# Altium PCB Shock_Sensor.PcbDoc (part 1 of 2)
Units mm, origin at the board's own origin, x right, y up, seen from the top; angles counter-clockwise.
Board outline 51.25 x 37.38 mm, 2 copper layers (Top Layer, Bottom Layer), stack 1.448 mm thick; 59 components, 38 nets, 215 pads, 74 vias.
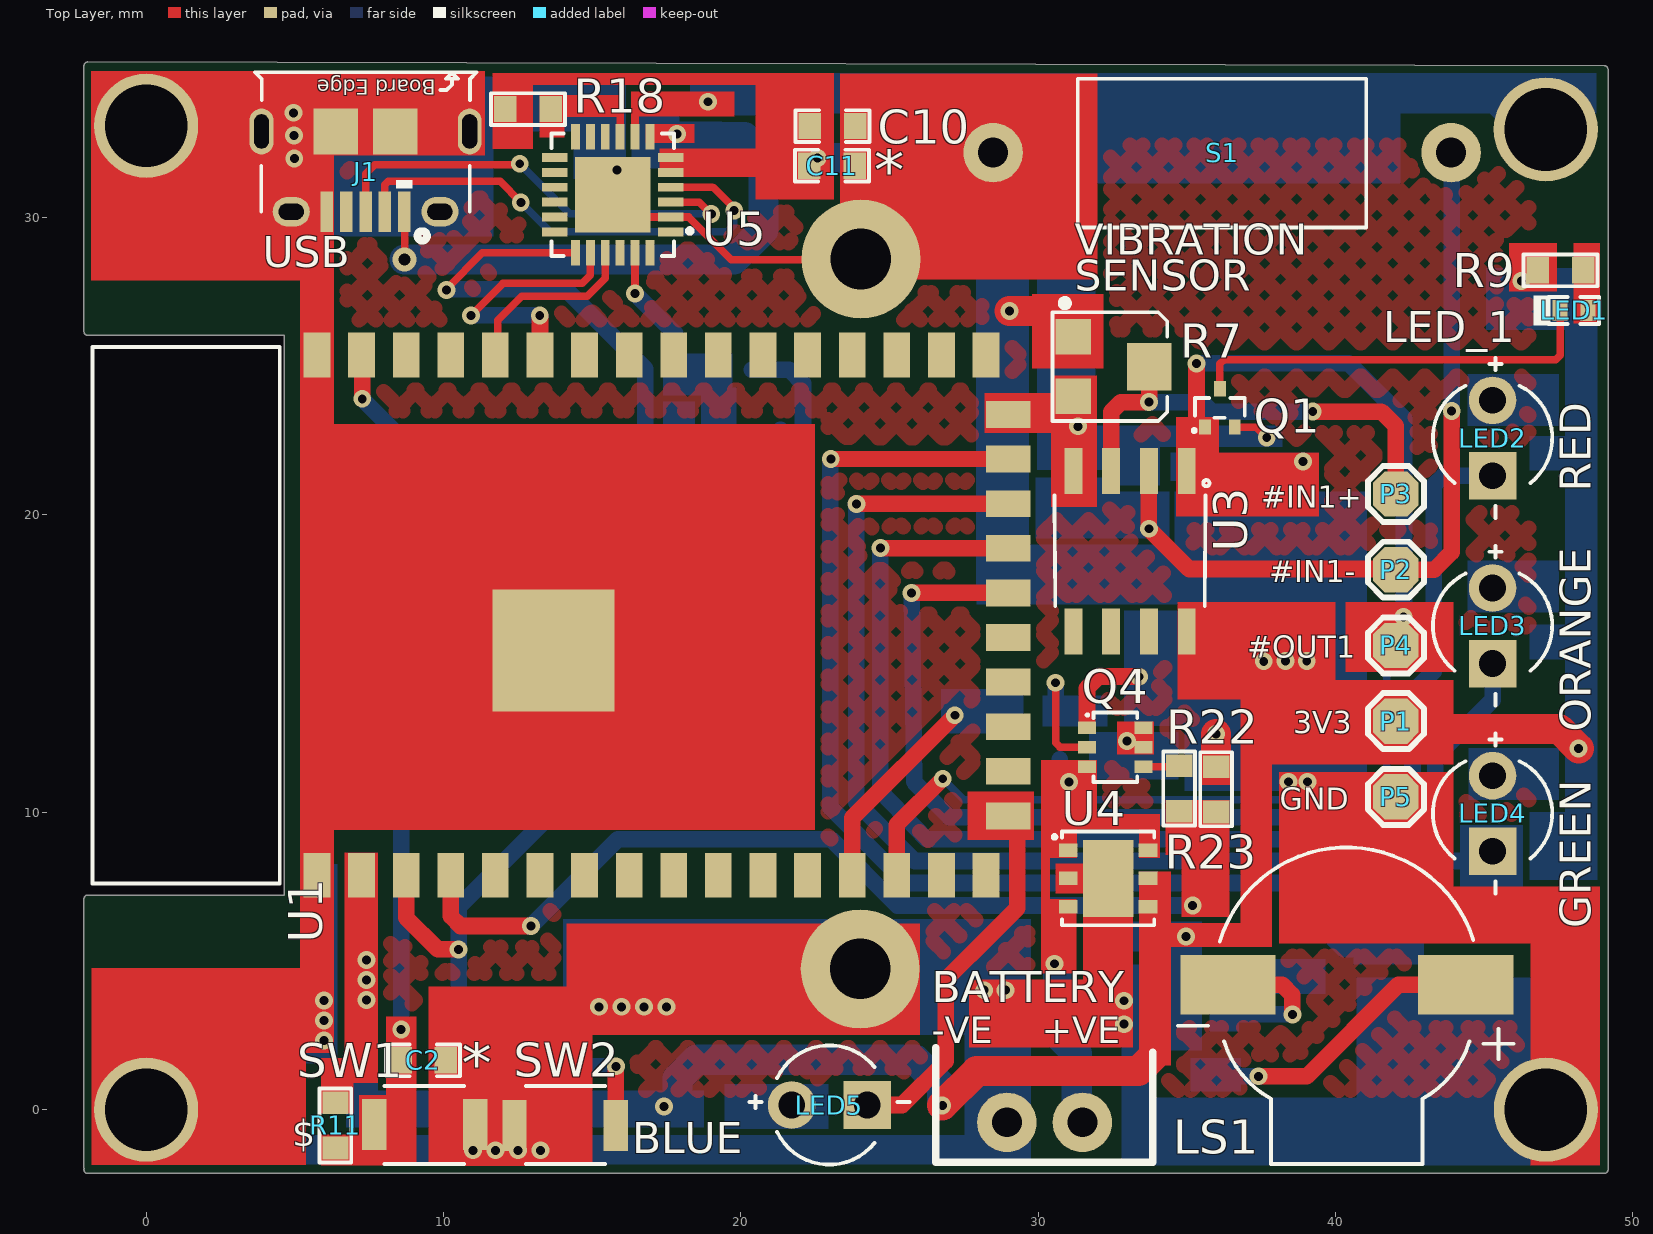
[diagram p0: Top Layer view]
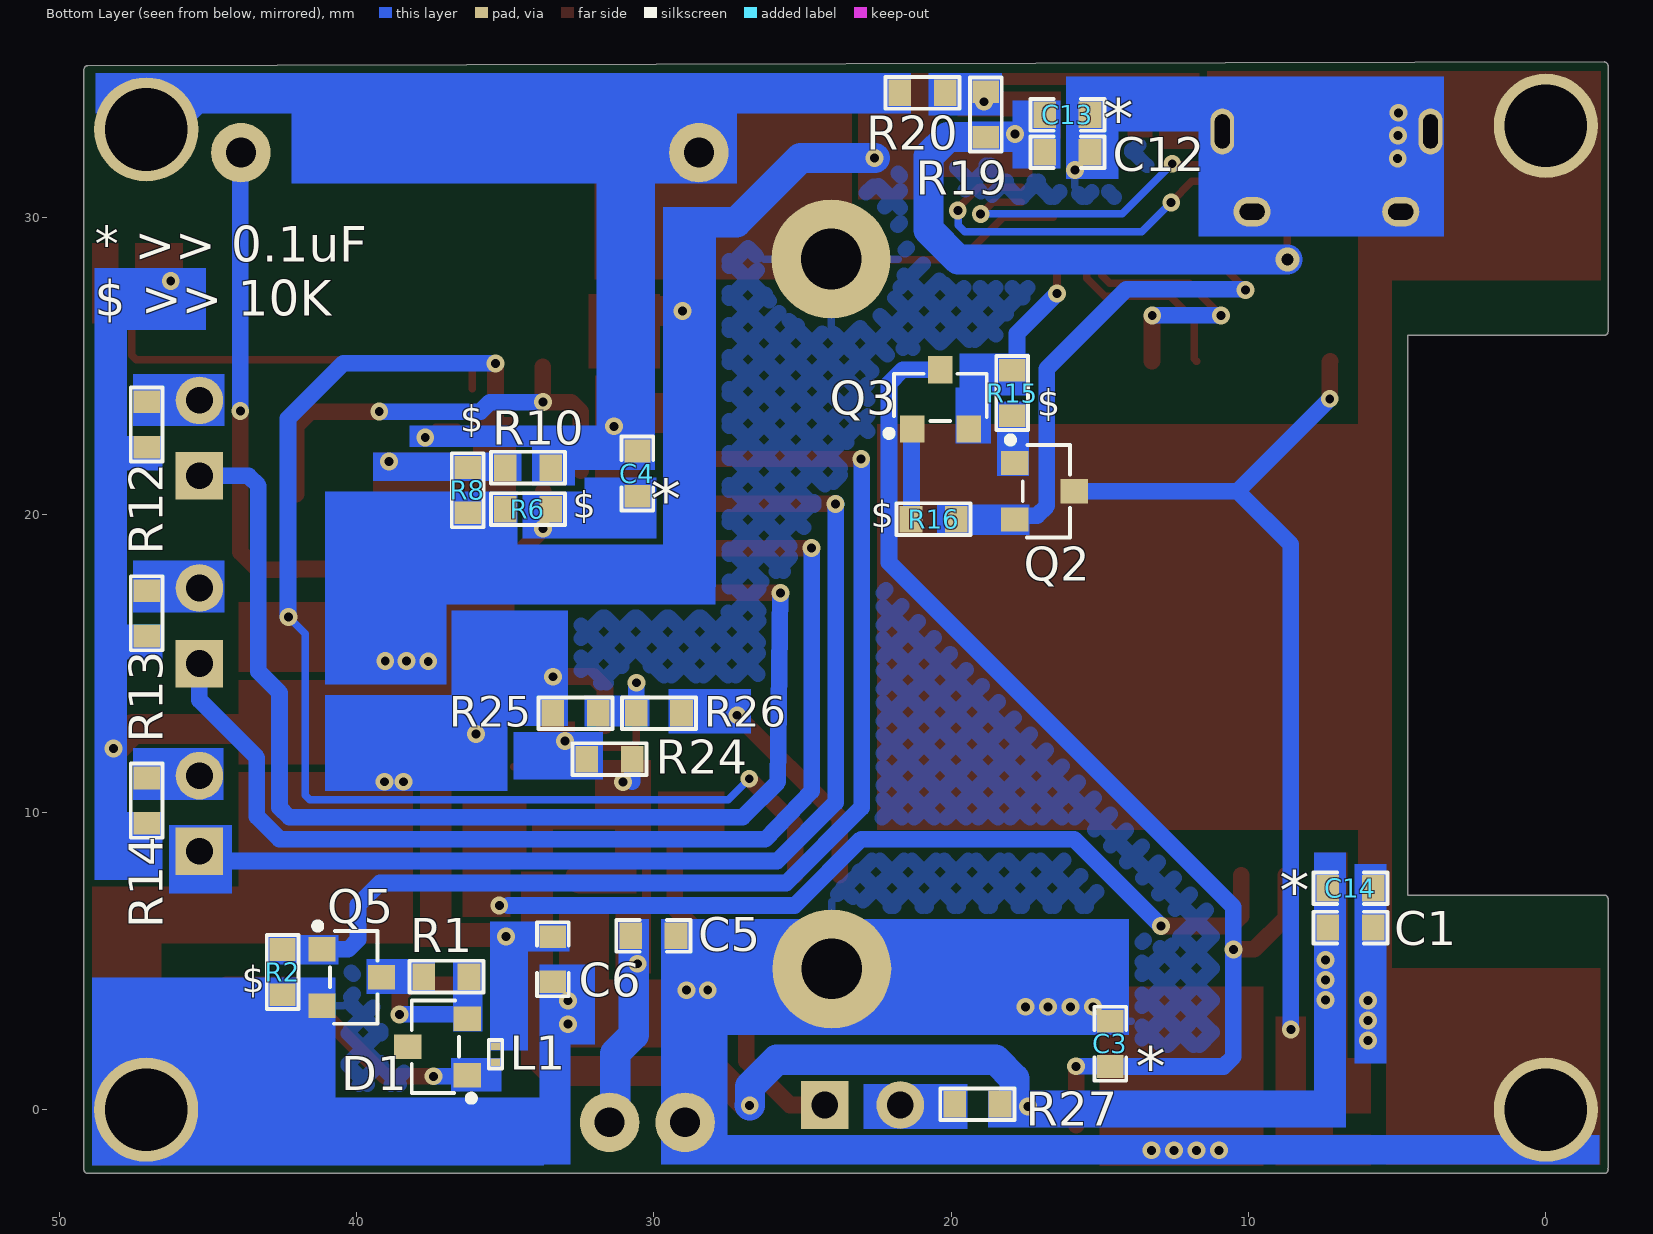
[diagram p1: Bottom Layer view, seen from below]
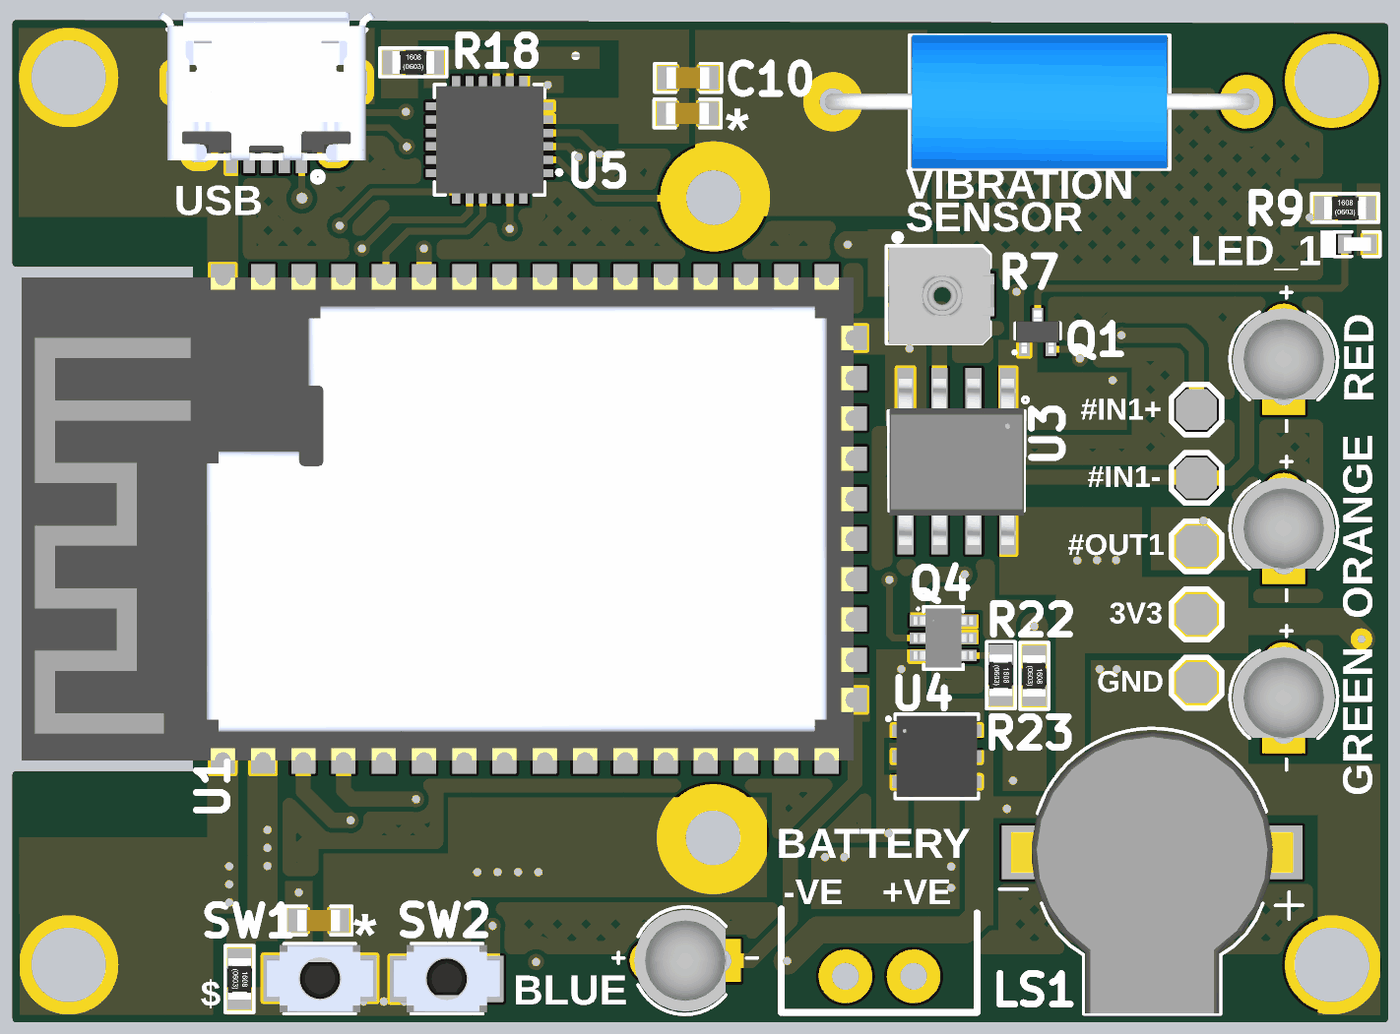
[diagram p2: 3D render of the assembled board from above, using the file's embedded part models]
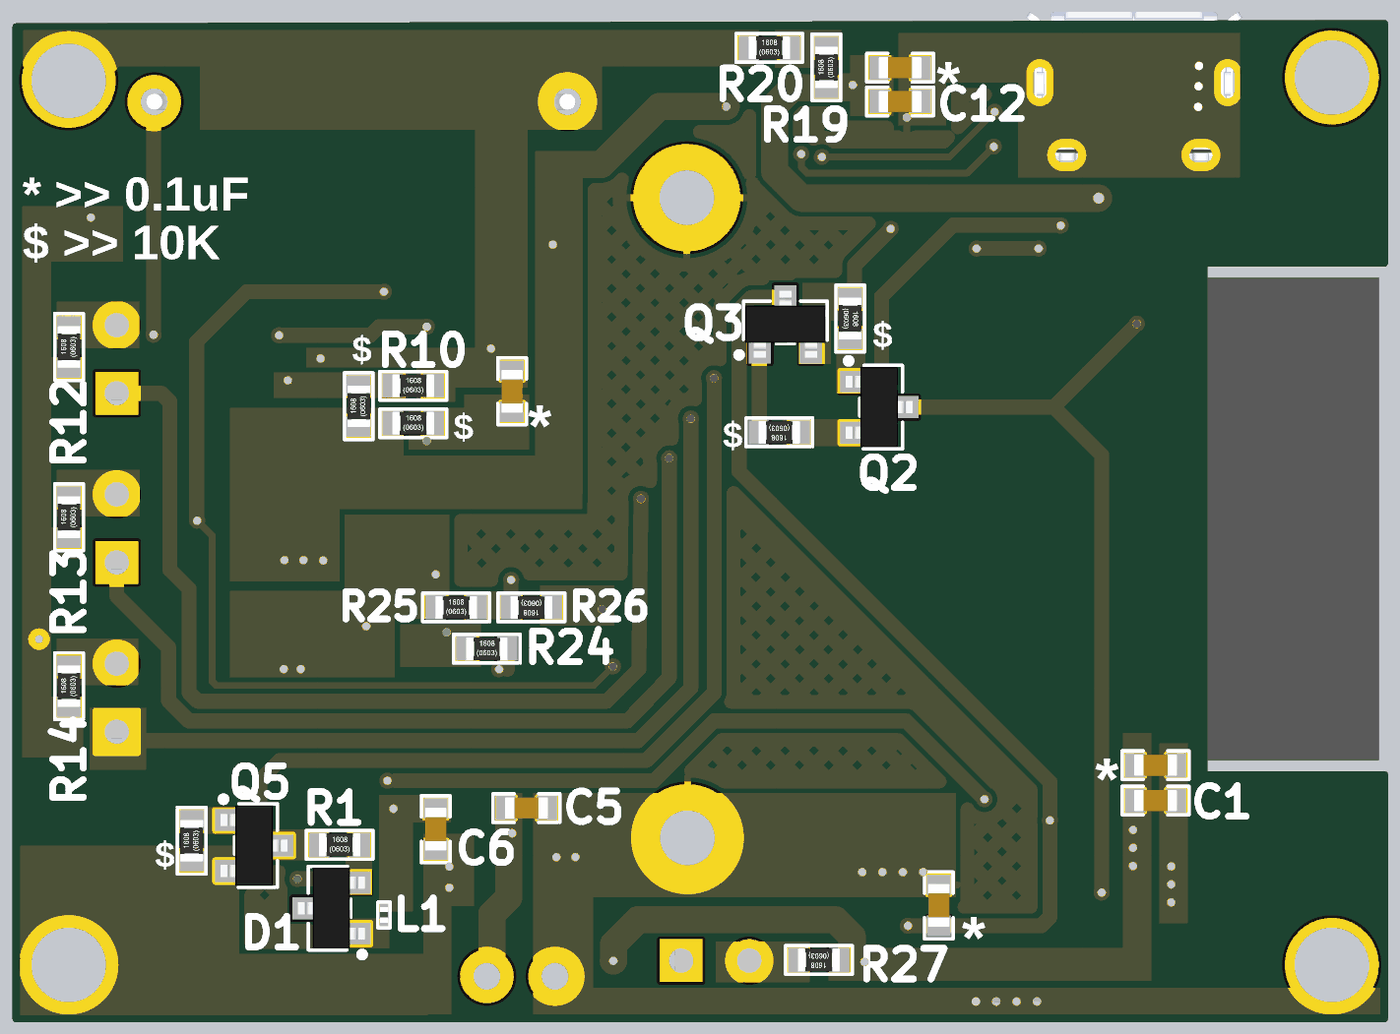
[diagram p3: 3D render of the assembled board from below, using the file's embedded part models]

## Layer stack, top to bottom
Top Solder: solder mask 0.0762, Solder Resist, Dk 3.5
Top Layer: signal copper 0.254
Dielectric 1: dielectric 0.9398, FR-4, Dk 4.8
Bottom Layer: signal copper 0.254
Bottom Solder: solder mask 0.0762, Solder Resist, Dk 3.5

## Board outline
-2.093,-0.148 cw(c-1.966,-0.147) -2.093,-0.147 -2.093,0.564 cw(c-1.966,0.564) -2.093,0.565 -2.093,7.092 cw(c-1.966,7.092) -1.966,7.219 4.638,7.219 4.638,26.04 -1.966,26.04 cw(c-1.966,26.167) -2.093,26.167 -2.093,35.108 cw(c-1.966,35.108) -1.966,35.235 49.034,35.111 cw(c49.034,34.983) 49.161,34.983 49.161,-2.011 cw(c49.034,-2.017) 49.161,-2.017 cw(c49.034,-2.017) 49.034,-2.144 -1.966,-2.144 cw(c-1.966,-2.017) -2.09,-1.989 cw(c-1.966,-1.961)

## Design rules (kind name [scope] priority, off if disabled: settings)
Clearance [All] p1: gap=0.178 ignorepadtopadclearanceinfootprint=FALSE except(0: Arc-Hole Track-Hole SMDPad-Hole THPad-Hole Via-Hole Fill-Hole Poly-Hole Region-Hole Text-Hole; 0.076: Arc-SMDPad Track-SMDPad SMDPad-SMDPad)
HoleSize [All] p1: absolutevalues=TRUE maxlimit=5.08 minlimit=0.025 maxpercent=80.000 minpercent=20.000
HoleToHoleClearance [All] p1: gap=0 allowstackedmicrovias=TRUE
MinimumSolderMaskSliver [All] p1: minsoldermaskwidth=0
PolygonConnect [All] p1: connectstyle=Relief reliefconductorwidth=0.254 reliefentries=4 polygonreliefangle="90 Angle" airgapwidth=0.254
RoutingVias [All] p1: holewidth=0.3 width=0.6 viastyle="Through Hole" minholewidth=0.3 minwidth=0.6 maxholewidth=0.4 maxwidth=0.8
SilkToSilkClearance [All] p1: silktosilkclearance=0
SilkToSolderMaskClearance [IsPad] p1: minsilkscreentomaskgap=0 clearancetoexposedcopper=TRUE
SolderMaskExpansion [All] p1: expansion=0.102 istentingtop=FALSE
Width [All] p1: maxlimit=1.016 minlimit=0.254 preferedwidth=0.559
25 further rules are at their usual default settings.

## Classes and differential pairs
component class U_Sensor_Section: 3 C4 D1 L1 LED1 P1 P2 P3 P4 P5 Q1 Q5 R1 R2 R6 R7 R8 R9 R10 S1 U3
component class U_Power_Section: C5 C6 U4
component class U_Controller_Section: C1 C2 C3 C14 D2 D3 D4 D5 LED2 LED3 LED4 LED5 Q2 Q3 R11 R12 R13 R14 R15 R16 R27 SW1 SW2 U1
component class U_Connector_Section: C10 C11 C12 C13 J1 R18 R19 R20 U5
component class U_ADC_Section: l Q4 R22 R23 R24 R25 R26

## Components (designator, comment, footprint, x,y, rotation, side; value= is the part's Value field where it differs from the comment)
C1 "22uF" CAP-0603 6.568,6.127 r180 bottom locked
C2 "0.1uF" CAP-0603 9.312,1.656 r0 top locked
C3 "0.1uF" CAP-0603 14.646,2.215 r90 bottom locked
C4 "0.1uF" CAP-0603 30.546,21.392 r270 bottom locked
C5 "1uF" CAP-0603 30.013,5.847 r180 bottom locked
C6 "1uF" CAP-0603 33.391,5.06 r270 bottom locked
C10 "4.7uF" CAP-0603 23.081,33.081 r0 top locked
C11 "0.1uF" CAP-0603 23.061,31.748 r0 top locked
C12 "4.7uF" CAP-0603 16.088,32.2 r180 bottom locked
C13 "0.1uF" CAP-0603 16.088,33.454 r180 bottom locked
C14 "0.1uF" CAP-0603 6.568,7.447 r180 bottom locked
D1 "BAL74,215" sot-23 37.277,2.113 r90 bottom locked
J1 "10118194-0001LF" 10118194-0001LF 7.377,31.549 r180 top locked
L1 "MMZ0603S601CT000" "IND 0201" 35.321,1.864 r270 bottom locked
LED1 "XZVG68W-2" "LED 0402" 48.021,26.878 r180 top locked
LED2 "204-10SURT/S530-A3" Through_Hole_LED 45.278,22.586 r90 top locked
LED3 "204-10UYOC/S530-A3-L" Through_Hole_LED 45.278,16.274 r90 top locked
LED4 "204-10SYGC/S530-E2-L" Through_Hole_LED 45.278,9.962 r90 top locked
LED5 "204-10SUBC/C470/S400-A4" Through_Hole_LED 22.977,0.158 r180 top locked
LS1 "YS-SBZ9032C03R16" YS-SBZ9032C03R16 40.376,4.196 r180 top
P1 "TEST POINT" "TEST POINT" 42.027,13.067 r0 top locked
P2 "TEST POINT" "TEST POINT" 42.027,18.16 r0 top locked
P3 "TEST POINT" "TEST POINT" 42.027,20.706 r270 top locked
P4 "TEST POINT" "TEST POINT" 42.027,15.613 r0 top locked
P5 "TEST POINT" "TEST POINT" 42.027,10.521 r0 top locked
Q1 "2N7002T-7-F" SOT-523 36.109,23.602 r0 top locked
Q2 "MMBT2222A-7-F" sot-23 16.863,20.798 r270 bottom locked
Q3 "MMBT2222A-7-F" sot-23 20.36,23.889 r180 bottom locked
Q4 "BSS8402DW-7-F" SOT-363 32.593,12.187 r0 top locked
Q5 "BSS138LT1G" sot-23 40.157,4.45 r270 bottom locked
R1 "47R" RES-0603 36.972,4.476 r0 bottom locked
R2 "10K" RES-0603 42.484,4.628 r270 bottom locked
R6 "10K" RES-0603 34.229,20.198 r0 bottom locked
R7 "10K" TC33X-2-103E 32.456,24.989 r270 top locked
R8 "10K" RES-0603 36.261,20.833 r270 bottom locked
R9 "4.7K" RES-0603 47.564,28.225 r180 top locked
R10 "470K" RES-0603 34.229,21.595 r0 bottom locked
R11 "10K" RES-0603 6.365,-0.528 r90 top locked
R12 "560R" RES-0603 47.056,23.043 r270 bottom locked
R13 "560R" RES-0603 47.056,16.693 r270 bottom locked
R14 "560R" RES-0603 47.056,10.394 r270 bottom locked
R15 "10K" RES-0603 17.947,24.102 r90 bottom locked
R16 "10K" RES-0603 20.588,19.86 r180 bottom locked
R18 "1K" RES-0603 12.84,33.653 r180 top locked
R19 "22.1K" RES-0603 18.832,33.47 r270 bottom locked
R20 "47.5K" RES-0603 20.96,34.196 r0 bottom locked
R22 "100K" RES-0603 34.737,10.8 r90 top locked
R23 "100K" RES-0603 35.982,10.775 r90 top locked
R24 "100K" RES-0603 31.486,11.791 r0 bottom locked
R25 "100K" RES-0603 32.629,13.332 r0 bottom locked
R26 "4.7K" RES-0603 29.827,13.332 r180 bottom locked
R27 "560R" RES-0603 19.116,0.183 r180 bottom locked
S1 "SW-420" SW-420 36.181,32.187 r0 top locked
SW1 "B3U-1000P" B3U-1000P 9.364,-0.503 r0 top locked
SW2 "B3U-1000P" B3U-1000P 14.087,-0.528 r180 top locked
U1 "ESP32-S2-WROOM(4MB)" ESP32-S2-WROOM(4MB) 17.367,16.629 r90 top locked
U3 "LM393ADT" 8-SOIC 33.086,18.783 r270 top locked
U4 "NCP692MN33T2G" "6-DFN (3x3)" 32.349,7.778 r0 top locked
U5 "CP2102N-A02-GQFN24R" CP2102N-A02-GQFN24R 15.688,30.771 r180 top locked

## Footprints (in the part's own frame and the unit in brackets; to place one, negate y for a bottom-side part, rotate by r counter-clockwise, add the part's x,y. Pads: shape width x height; smd on the part's side, far side on the other; paste and mask are expansions set on the pad)
"6-DFN (3x3)" [mm]
  rect 0.63x0.45 smd: 1(-1.34,0.95) 2(-1.34,0) 3(-1.34,-0.95) 4(1.34,-0.95) 5(1.34,0) 6(1.34,0.95)
  rect 1.7x2.6 smd: 7(0,0)
  silkscreen extent -1.87,-1.57 1.55,1.57, body extent -1.5,-1.5 1.5,1.5, height 0.99
8-SOIC [mm]
  rect 1.55x0.6 smd: 1(-2.7,1.905) 2(-2.7,0.635) 3(-2.7,-0.635) 4(-2.7,-1.905) 5(2.7,-1.905) 6(2.7,-0.635) 7(2.7,0.635) 8(2.7,1.905)
  silkscreen extent -2.39,-2.54 1.85,2.67, body extent -3.07,-2.5 3.12,2.5, height 1.76
10118194-0001LF [mm]
  rect 0.42x1.35 smd: 1(-1.3,1.35) 2(-0.65,1.35) 3(0,1.35) 4(0.65,1.35) 5(1.3,1.35)
  oval 1.25x1 hole 0.55 slot 0.85 at 0 deg: MH1(-2.5,1.35) MH2(2.5,1.35)
  oval 0.8x1.55 hole 0.5 slot 1.15 at 90 deg: MH3(-3.5,-1.35) MH4(3.5,-1.35)
  rect 1.5x1.55 smd: MP1(-1,-1.35) MP2(1,-1.35)
  Top Layer region: 193 vertices and 0 holes, not listed, extent -4,-2.125 -2.3,-0.57
  Top Layer region: 193 vertices and 0 holes, not listed, extent 2.3,-2.13 4,-0.575
  silkscreen extent -3.74,-3.34 3.72,2.33, body extent -4.02,-3.99 4.03,1.54, height 2.87
B3U-1000P [mm] "SWITCH TACTILE SPST-NO 0.05A 12V"
  rect 0.82x1.72 smd: 1(-1.7,0) 2(1.7,0)
  silkscreen extent -1.35,-1.32 1.32,1.3, body extent -2,-1.26 2,1.24, height 1.6
CAP-0603 [mil]
  rect 30x35 smd mask+2.36: 1(-30,0) 2(30,0)
  silkscreen extent -49,-21 49,21, body extent -32,-16 31,16, height 34
CP2102N-A02-GQFN24R [mm]
  rect 0.85x0.3 smd: 1(-1.95,1.25) 2(-1.95,0.75) 3(-1.95,0.25) 4(-1.95,-0.25) 5(-1.95,-0.75) 6(-1.95,-1.25) 13(1.95,-1.25) 14(1.95,-0.75) 15(1.95,-0.25) 16(1.95,0.25) 17(1.95,0.75) 18(1.95,1.25)
  rect 0.3x0.85 smd: 7(-1.25,-1.95) 8(-0.75,-1.95) 9(-0.25,-1.95) 10(0.25,-1.95) 11(0.75,-1.95) 12(1.25,-1.95) 19(1.25,1.95) 20(0.75,1.95) 21(0.25,1.95) 22(-0.25,1.95) 23(-0.75,1.95) 24(-1.25,1.95)
  rect 2.55x2.55 smd: 25(0,0)
  silkscreen extent -2.64,-2.06 2.06,2.06, body extent -2,-2 2,2, height 0.8
ESP32-S2-WROOM(4MB) [mm] "RX TXRX MOD WIFI SURFACE MOUNT"
  rect 1.5x0.9 smd: 1(-8.75,11.625) 2(-8.75,10.125) 3(-8.75,8.625) 4(-8.75,7.125) 5(-8.75,5.625) 6(-8.75,4.125) 7(-8.75,2.625) 8(-8.75,1.125) 9(-8.75,-0.375) 10(-8.75,-1.875) 11(-8.75,-3.375) 12(-8.75,-4.875) 13(-8.75,-6.375) 14(-8.75,-7.875) 15(-8.75,-9.375) 16(-8.75,-10.875) 27(8.75,-10.875) 28(8.75,-9.375) 29(8.75,-7.875) 30(8.75,-6.375) 31(8.75,-4.875) 32(8.75,-3.375) 33(8.75,-1.875) 34(8.75,-0.375) 35(8.75,1.125) 36(8.75,2.625) 37(8.75,4.125) 38(8.75,5.625) 39(8.75,7.125) 40(8.75,8.625) 41(8.75,10.125) 42(8.75,11.625)
  rect 0.9x1.5 smd: 17(-6.75,-11.625) 18(-5.25,-11.625) 19(-3.75,-11.625) 20(-2.25,-11.625) 21(-0.75,-11.625) 22(0.75,-11.625) 23(2.25,-11.625) 24(3.75,-11.625) 25(5.25,-11.625) 26(6.75,-11.625)
  rect 4.1x4.1 smd: 43(-1.19,3.675)
  silkscreen extent -9.02,12.88 9.03,19.18, body extent -9,-11.88 9,19.12, height 3.45
"IND 0201" [mm]
  rect 0.25x0.3 smd: 1(-0.275,0) 2(0.275,0)
  silkscreen extent -0.48,-0.23 0.48,0.23, body extent -0.3,-0.15 0.3,0.15, height 0.15
"LED 0402" [mm] "LED BLUE CLEAR CHIP SMD"
  rect 0.5x0.7 smd: 1(-0.47,0) 2(0.47,0)
  silkscreen extent -0.84,-0.51 1.37,0.51, body extent -0.5,-0.25 0.5,0.25, height 0.5
RES-0603 [mil]
  rect 30x35 smd: 1(-30,0) 2(30,0)
  silkscreen extent -49,-21 49,21, body extent -31,-17 31,17, height 18
sot-23 [mm]
  rect 0.82x0.92 smd: 1(-0.95,-1) 2(0.95,-1) 3(0,1)
  silkscreen extent -1.82,-1.23 1.56,0.86, body extent -1.5,-1.25 1.5,1.25, height 1.1
SOT-363 [mm]
  rect 0.6x0.42 smd: 1(-0.95,0.65) 2(-0.95,0) 3(-0.95,-0.65) 4(0.95,-0.65) 5(0.95,0) 6(0.95,0.65)
  silkscreen extent -0.97,-1.17 0.74,1.17, body extent -1.1,-1.1 1.11,1.11, height 1.09
SOT-523 [mm]
  rect 0.4x0.51 smd: 1(-0.5,-0.645) 2(0.5,-0.645) 3(0,0.645)
  silkscreen extent -0.91,-0.81 0.84,0.33, body extent -0.8,-0.8 0.8,0.8, height 0.8
SW-420 [mm]
  round 2 hole 1: 1(-7.7,0) 2(7.7,0)
  silkscreen extent -4.85,-2.51 4.85,2.49, body extent -8,-2.5 8,2.5, height 5
TC33X-2-103E [mm]
  rect 1.2x1.2 smd: 1(-1,-1.275) 3(1,-1.275)
  rect 1.6x1.5 smd: 2(0,1.275)
  silkscreen extent -2.24,-1.98 1.83,1.88, body extent -1.76,-1.92 1.84,2.05, height 1.13
"TEST POINT" [mil]
  oct 60x60 smd: 1(0,0)
  silkscreen extent -37,-37 37,37
Through_Hole_LED [mm]
  rect 1.6x1.6 hole 0.9: 1(-1.27,0)
  round 1.6 hole 0.9: 2(1.27,0)
  silkscreen extent -2.69,-2 2.69,2, body extent -1.52,-1.9 1.9,1.9, height 5.2
YS-SBZ9032C03R16 [mm] "NO 2700Hz 85dB @ 3V, 10cm 3V F9mm SMD,9x3.2mm Buzzers RoHS"
  rect 3.2x2 smd: 1(-4,0) 2(4,0)
  silkscreen extent -5.61,-4.62 5.68,6.02, body extent -5.25,-4.5 5.25,6, height 2.6

## Part data
C1: library part CL10A226MO7JZNC, "CAP CER 22UF 16V X5R 0603", Case Code (Imperial)=0603, Case Code (Metric)=1608, Manufacturer=Samsung, Max Operating Temperature=85°C, Min Operating Temperature=-55°C, Supplier Part Number 1=1276-7076-1-ND, Tolerance=20%, Voltage Rating=16V, Capacitance=22uF, Case/Package=0603, Category="Ceramic Capacitors", ComponentLink1Description=http://www.samsungsem.com/kr/support/product-search/mlcc/CL10A226MO7JZNC.jsp?src-supplier=Digi-Key, ComponentLink1URL=http://www.samsungsem.com/kr/support/product-search/mlcc/CL10A226MO7JZNC.jsp?src-supplier=Digi-Key, Manufacturer Part Number=CL10A226MO7JZNC, Mount="Surface Mount", Packaging="Tape and Reel", Pricing 1="1=0.67000, 10=0.47700, 50=0.36040, 100=0.31390, 500=0.23248, 1000=0.19761 (USD)", RoHS=Yes, RoHS Compliant=No, Stock 1=48192, Supplier 1=Digi-Key
C2 C3 C4 C14: library part CL10B104KB8NNNL, "CL10 Series 0603 0.1 uF 50 V ±10% Tolerance X7R Multilayer Ceramic Capacitor", Capacitance=100nF, Case/Package=0603, Dielectric=X7R, Manufacturer=Samsung, Max Operating Temperature=125°C, Min Operating Temperature=-55°C, Package Quantity=15000, Supplier Part Number 1=1276-CL10B104KB8NNNLDKR-ND, Tolerance=10%, Voltage Rating=50V, Category="Ceramic Capacitors", ComponentLink1Description=https://datasheet.ciiva.com/26838/getdatasheetpartid-357523-26838415.pdf?src-supplier=Verical, ComponentLink1URL=https://datasheet.ciiva.com/26838/getdatasheetpartid-357523-26838415.pdf?src-supplier=Verical, ComponentLink2Description=https://datasheet.ciiva.com/25741/cl10b104kb8nnnl-25741341.pdf?src-supplier=Digi-Key, ComponentLink2URL=https://datasheet.ciiva.com/25741/cl10b104kb8nnnl-25741341.pdf?src-supplier=Digi-Key, Construction=Flat, Depth=0.8mm, Height=0.8mm, Length=1.6mm, Manufacturer Part Number=CL10B104KB8NNNL, Mount="Surface Mount", Packaging="Tape and Reel", Pricing 1="1=0.10000, 10=0.03100, 50=0.01660, 100=0.01360, 500=0.00974, 1000=0.00765, 2500=0.00696, 5000=0.00640 (USD)", Radiation Hardening=No, RoHS=Yes, RoHS Compliant=Yes, Series=CL, Supplier 1=Digi-Key, Thickness=0.035inch, Voltage Rating (DC)=50V, Width=0.031inch
C5 C6: library part CL10A105KA8NNNC, "Ceramic capacitor SMD-0603 1000nF/25V X7R# K +-10%, Samsung, RoHS", Case Code (Imperial)=0603, Case Code (Metric)=1608, Dielectric=X5R, Manufacturer=Samsung, Max Operating Temperature=85°C, Min Operating Temperature=-55°C, Package Quantity=1, Supplier Part Number 1=1276-1102-6-ND, Tolerance=10%, Voltage=25V, Capacitance=1uF, Case/Package=0603, Category="Ceramic Capacitors", ComponentLink1Description=https://datasheet.ciiva.com/25801/cl10a105ka8nnnc-25801364.pdf?src-supplier=Digi-Key, ComponentLink1URL=https://datasheet.ciiva.com/25801/cl10a105ka8nnnc-25801364.pdf?src-supplier=Digi-Key, ComponentLink2Description=https://datasheet.ciiva.com/26838/getdatasheetpartid-357530-26838332.pdf?src-supplier=Verical, ComponentLink2URL=https://datasheet.ciiva.com/26838/getdatasheetpartid-357530-26838332.pdf?src-supplier=Verical, ComponentLink3Description=https://datasheet.ciiva.com/29198/458162-da-01-en-vs-kondensator-0603-29198475.pdf?src-supplier=Conrad, ComponentLink3URL=https://datasheet.ciiva.com/29198/458162-da-01-en-vs-kondensator-0603-29198475.pdf?src-supplier=Conrad, Contact Plating=Tin, Depth=0.8mm, Height=0.8mm, Lead Free="Lead Free", Length=0.063inch, Manufacturer Part Number=CL10A105KA8NNNC, Material=Ceramic, Mount="Surface Mount", Packaging="Tape and Reel", Pricing 1="1=0.10000, 10=0.03500, 50=0.01940, 100=0.01580, 500=0.01128, 1000=0.00886 (USD)", Radiation Hardening=No, RoHS=Yes, RoHS Compliant=Yes, Series=CL, Supplier 1=Digi-Key, Thickness=0.035inch, Voltage Rating=25V, Voltage Rating (DC)=25V, Width=0.031inch
C10 C12: library part GRM188R61E475KE11D, "CAP CER 4.7UF 25V X5R 0603", Case Code (Imperial)=0603, Case Code (Metric)=1608, Dielectric=X5R, Manufacturer=Murata, Max Operating Temperature=85°C, Min Operating Temperature=-55°C, Package Quantity=4000, Supplier Part Number 1=490-7203-1-ND, Tolerance=10%, Voltage=25V, Capacitance=4.7uF, Case/Package=0603, Category="Ceramic Capacitors", ComponentLink1Description=https://datasheet.ciiva.com/46444/1769893-46444982.pdf?src-supplier=Element14, ComponentLink1URL=https://datasheet.ciiva.com/46444/1769893-46444982.pdf?src-supplier=Element14, ComponentLink2Description=https://datasheet.ciiva.com/46444/1769893-46444983.pdf?src-supplier=Element14, ComponentLink2URL=https://datasheet.ciiva.com/46444/1769893-46444983.pdf?src-supplier=Element14, ComponentLink3Description=https://datasheet.ciiva.com/14891/partnumbering-e-01-14891102.pdf?src-supplier=Digi-Key, ComponentLink3URL=https://datasheet.ciiva.com/14891/partnumbering-e-01-14891102.pdf?src-supplier=Digi-Key, ComponentLink4Description=https://datasheet.ciiva.com/14891/partnumbering-e-01-14891103.pdf?src-supplier=Digi-Key, ComponentLink4URL=https://datasheet.ciiva.com/14891/partnumbering-e-01-14891103.pdf?src-supplier=Digi-Key, Depth=0.8mm, Height=0.8mm, Lead Free="Lead Free", Length=1.6mm, Manufacturer Part Number=GRM188R61E475KE11D, Material=Ceramic, Mount="Surface Mount", Packaging="Cut Tape", Pricing 1="1=0.37000, 10=0.25800, 50=0.18080, 100=0.15490, 500=0.11618, 1000=0.09811 (USD)", REACH SVHC="No SVHC", RoHS=Yes, RoHS Compliant=Yes, Series=GRM, Stock 1=102106, Supplier 1=Digi-Key, Thickness=0.031inch, Voltage Rating=25V, Voltage Rating (DC)=25V, Width=0.031inch
C11 C13: library part CL10B104KB8NNNL, "CAP CER 0.1UF 50V X7R 0603", Capacitance=100nF, Case/Package=0603, Dielectric=X7R, Manufacturer=Samsung, Max Operating Temperature=125°C, Min Operating Temperature=-55°C, Package Quantity=15000, Supplier Part Number 1=1276-CL10B104KB8NNNLDKR-ND, Tolerance=10%, Voltage Rating=50V, Category="Ceramic Capacitors", ComponentLink1Description=https://datasheet.ciiva.com/26838/getdatasheetpartid-357523-26838415.pdf?src-supplier=Verical, ComponentLink1URL=https://datasheet.ciiva.com/26838/getdatasheetpartid-357523-26838415.pdf?src-supplier=Verical, ComponentLink2Description=https://datasheet.ciiva.com/25741/cl10b104kb8nnnl-25741341.pdf?src-supplier=Digi-Key, ComponentLink2URL=https://datasheet.ciiva.com/25741/cl10b104kb8nnnl-25741341.pdf?src-supplier=Digi-Key, Construction=Flat, Depth=0.8mm, Height=0.8mm, Length=1.6mm, Manufacturer Part Number=CL10B104KB8NNNL, Mount="Surface Mount", Packaging="Tape and Reel", Pricing 1="1=0.10000, 10=0.03100, 50=0.01660, 100=0.01360, 500=0.00974, 1000=0.00765, 2500=0.00696, 5000=0.00640 (USD)", Radiation Hardening=No, RoHS=Yes, RoHS Compliant=Yes, Series=CL, Supplier 1=Digi-Key, Thickness=0.035inch, Voltage Rating (DC)=50V, Width=0.031inch
D1: "DIODE GEN PURP 50V 215MA SOT23", Average Rectified Current=215mA, Case/Package=TO-236-3, Forward Current=150mA, Forward Voltage=1.25V, Manufacturer="NXP Semiconductors", Manufacturer Part Number=BAL74215, Max Forward Surge Current (Ifsm)=4A, Max Operating Temperature=150°C, Max Repetitive Reverse Voltage (Vrrm)=50V, Max Reverse Current=100nA, Min Operating Temperature=-65°C, Package Quantity=1, Supplier Part Number 1=75R4923, Category="Rectifier Diodes", ComponentLink1Description=https://datasheet.ciiva.com/8299/bal74-8299264.pdf?src-supplier=Avnet, ComponentLink1URL=https://datasheet.ciiva.com/8299/bal74-8299264.pdf?src-supplier=Avnet, ComponentLink2Description=https://datasheet.ciiva.com/1179/453930-1179601.pdf?src-supplier=Element14, ComponentLink2URL=https://datasheet.ciiva.com/1179/453930-1179601.pdf?src-supplier=Element14, ComponentLink3Description=https://datasheet.ciiva.com/4434/bal74-109975-4434835.pdf?src-supplier=Mouser, ComponentLink3URL=https://datasheet.ciiva.com/4434/bal74-109975-4434835.pdf?src-supplier=Mouser, ComponentLink4Description=https://datasheet.ciiva.com/25953/bal74-25953738.pdf?src-supplier=Avnet+Europe, ComponentLink4URL=https://datasheet.ciiva.com/25953/bal74-25953738.pdf?src-supplier=Avnet+Europe, ComponentLink5Description=https://datasheet.ciiva.com/912/bal74-912156.pdf?src-supplier=Digi-Key, ComponentLink5URL=https://datasheet.ciiva.com/912/bal74-912156.pdf?src-supplier=Digi-Key, ComponentLink6Description=https://datasheet.ciiva.com/1202/453930-1202220.pdf?src-supplier=Farnell, ComponentLink6URL=https://datasheet.ciiva.com/1202/453930-1202220.pdf?src-supplier=Farnell, ComponentLink7Description=https://datasheet.ciiva.com/912/bal74-912157.pdf?src-supplier=Digi-Key, ComponentLink7URL=https://datasheet.ciiva.com/912/bal74-912157.pdf?src-supplier=Digi-Key, ComponentLink8Description=https://datasheet.ciiva.com/1202/453930-1202221.pdf?src-supplier=Farnell, ComponentLink8URL=https://datasheet.ciiva.com/1202/453930-1202221.pdf?src-supplier=Farnell, ComponentLink9Description=https://datasheet.ciiva.com/912/bal74-912158.pdf?src-supplier=Digi-Key, ComponentLink9URL=https://datasheet.ciiva.com/912/bal74-912158.pdf?src-supplier=Digi-Key, Contact Plating=Tin, Element Configuration=Single, Lead Free="Lead Free", Max Reverse Leakage Current=100nA, Max Reverse Voltage (DC)=50V, Max Surge Current=4A, Mount="Surface Mount", Number of Pins=3, Packaging="Tape and Reel", Peak Non-Repetitive Surge Current=4A, Radiation Hardening=No, REACH SVHC="No SVHC", Recovery Time=4ns, Reverse Recovery Time=4ns, RoHS=Yes, Supplier 1=Newark, Termination=SMD/SMT
J1: "CONN RCPT USB2.0 MICRO B SMD R/A", Color=Black, Current Rating=1.8A, Flammability Rating="UL94 V-0", Insulation Resistance=1GR, Manufacturer="Amphenol FCI", Max Operating Temperature=85°C, Max Voltage Rating (AC)=100V, Min Operating Temperature=-55°C, Package Quantity=9600, Supplier Part Number 1=609-4618-1-ND, ComponentLink1Description=http://www.amphenol-icc.com/media/wysiwyg/files/drawing/10118194.pdf?src-supplier=Digi-Key, ComponentLink1URL=http://www.amphenol-icc.com/media/wysiwyg/files/drawing/10118194.pdf?src-supplier=Digi-Key, ComponentLink2Description=https://cdn.amphenol-icc.com/media/wysiwyg/files/drawing/10118194.pdf?src-supplier=Mouser, ComponentLink2URL=https://cdn.amphenol-icc.com/media/wysiwyg/files/drawing/10118194.pdf?src-supplier=Mouser, ComponentLink3Description=https://cdn.amphenol-icc.com/media/wysiwyg/files/drawing/10118194.pdf?src-supplier=Verical, ComponentLink3URL=https://cdn.amphenol-icc.com/media/wysiwyg/files/drawing/10118194.pdf?src-supplier=Verical, Connector Type=USB,Receptacle, Contact Material="Copper Alloy", Contact Plating=Gold, Depth=5mm, Features=Shielded, Gender=Receptacle, Housing Material=Polymer, Lead Free="Lead Free", Length=8.05mm, Manufacturer Part Number=10118194-0001LF, Mount="Surface Mount,Horizontal", Number of Contacts=5, Number of Ports=1, Number of Terminals=5, Orientation="Right Angle", Packaging="Tape and Reel", Pitch=0.65mm, Pricing 1="1=0.43, 10=0.405, 25=0.3648, 50=0.3242, 100=0.3107, 250=0.28368, 500=0.27016 (USD)", Radiation Hardening=No, Stock 1=35943, Supplier 1=Digi-Key, Termination=Solder
L1: "FERRITE BEAD 600 OHM 0201 1LN", Case Code (Imperial)=0201, Case Code (Metric)=0603, Current Rating=100mA, DC Resistance (DCR)=1.45R, Manufacturer=TDK, Package Quantity=15000, Supplier Part Number 1=445-2146-1-ND, Tolerance=25%, Case/Package=0201, Category=Inductors, ComponentLink1Description=https://datasheet.ciiva.com/46381/1795294-46381669.pdf?src-supplier=Element14, ComponentLink1URL=https://datasheet.ciiva.com/46381/1795294-46381669.pdf?src-supplier=Element14, ComponentLink2Description=https://datasheet.ciiva.com/46634/beads-commercial-signal-mmz-en-46634390.pdf?src-supplier=Digi-Key, ComponentLink2URL=https://datasheet.ciiva.com/46634/beads-commercial-signal-mmz-en-46634390.pdf?src-supplier=Digi-Key, ComponentLink3Description=https://datasheet.ciiva.com/48682/beads-commercial-signal-mmz-en-48682603.pdf?src-supplier=Avnet, ComponentLink3URL=https://datasheet.ciiva.com/48682/beads-commercial-signal-mmz-en-48682603.pdf?src-supplier=Avnet, ComponentLink4Description=https://datasheet.ciiva.com/46634/beads-commercial-signal-mmz-en-46634381.pdf?src-supplier=Digi-Key, ComponentLink4URL=https://datasheet.ciiva.com/46634/beads-commercial-signal-mmz-en-46634381.pdf?src-supplier=Digi-Key, Core Material=Ferrite, Height=0.013inch, Impedance=600R, Lead Free="Lead Free", Length=0.024inch, Manufacturer Part Number=MMZ0603S601CT000, Max DC Current=100mA, Mount="Surface Mount", Packaging="Cut Tape", Pricing 1="1=0.12000, 10=0.09900, 25=0.07680, 50=0.06380, 100=0.05500, 250=0.04400, 500=0.03960, 1000=0.03300, 5000=0.03080 (USD)", REACH SVHC="No SVHC", RoHS=Yes, RoHS Compliant=Yes, Stock 1=1540, Supplier 1=Digi-Key, Width=0.012inch
LED1: "LED GREEN CLEAR CHIP SMD", Case Code (Imperial)=0402, Case Code (Metric)=1005, Color=Green, Forward Voltage=2.1V, Lens Color=Colorless, Manufacturer=SunLED, Supplier Part Number 1=1497-1219-1-ND, Test Current=20mA, Case/Package=0402, Category=LEDs, ComponentLink1Description=http://www.sunledusa.com/products/spec/XZVG68W-2.pdf?src-supplier=Digi-Key, ComponentLink1URL=http://www.sunledusa.com/products/spec/XZVG68W-2.pdf?src-supplier=Digi-Key, ComponentLink2Description=https://www.sunledusa.com/products/spec/XZVG68W-2.pdf?src-supplier=Digi-Key, ComponentLink2URL=https://www.sunledusa.com/products/spec/XZVG68W-2.pdf?src-supplier=Digi-Key, Dominant Wavelength=570nm, Height=0.6mm, Length=1mm, Lens Transparency=Clear, Luminous Intensity=49mcd, Manufacturer Part Number=XZVG68W-2, Mount="Surface Mount", Packaging="Tape and Reel", Pricing 1="1=0.37000, 10=0.29300, 100=0.13140, 500=0.11872, 1000=0.09752 (USD)", RoHS=Yes, RoHS Compliant=Yes, Stock 1=596167, Supplier 1=Digi-Key, Viewing Angle=120°, Width=0.5mm
LED2: "Red 624nm Through Hole Light Emitting Diodes (LED) ROHS", Manufacturer="Everlight Elec", Manufacturer Part No=204-10SURT/S530-A3
LED3: "Orange 605nm Through Hole 3mm Light Emitting Diodes (LED) ROHS", Manufacturer="Everlight Elec", Manufacturer Part No=204-10UYOC/S530-A3-L
LED4: "Green-yellow 573nm Through Hole Light Emitting Diodes (LED) ROHS", Manufacturer="Everlight Elec", Manufacturer Part No=204-10SYGC/S530-E2-L
LED5: "Blue 470nm Through Hole Light Emitting Diodes (LED) ROHS", Manufacturer="Everlight Elec", Manufacturer Part No=204-10SUBC/C470/S400-A4
LS1: "NO 2700Hz 85dB @ 3V, 10cm 3V Φ9mm SMD,9x3.2mm Buzzers RoHS", Frequency - Self Resonant=2700Hz, Manufacturer=Fengming, Operating Voltage="2 ~ 4V", Package=SMD,9x3.2mm, Rated Voltage=3V
P1 P2 P3 P4 P5: "Test Point ON"
Q1: "MOSFET N-Channel 60V 0.115A SOT523", Case/Package=SOT-523, Continuous Drain Current (ID)=115mA, Drain to Source Breakdown Voltage=60V, Drain to Source Resistance=4.4R, Drain-source On Resistance-Max=7.5R, Gate to Source Voltage (Vgs)=20V, Input Capacitance=50pF, Manufacturer=Diodes, Max Operating Temperature=150°C, Max Power Dissipation=150mW, Min Operating Temperature=-55°C, Package Body Material=Plastic, Package Quantity=3000, Package Shape=Rectangular, Peak Reflow Temperature (Cel)=260°C, Supplier Part Number 1=2N7002T-FDICT-ND, Threshold Voltage=2V, Time @ Peak Reflow Temperature-Max (s)=10s, Category=MOSFETs, ComponentLink1Description=https://datasheet.ciiva.com/17103/2n7002t-7-f-17103286.pdf?src-supplier=Allied+Electronics, ComponentLink1URL=https://datasheet.ciiva.com/17103/2n7002t-7-f-17103286.pdf?src-supplier=Allied+Electronics, ComponentLink2Description=https://datasheet.ciiva.com/3304/ds30301-3304394.pdf?src-supplier=Avnet, ComponentLink2URL=https://datasheet.ciiva.com/3304/ds30301-3304394.pdf?src-supplier=Avnet, ComponentLink3Description=https://datasheet.ciiva.com/34302/1538460-34302350.pdf?src-supplier=Jameco, ComponentLink3URL=https://datasheet.ciiva.com/34302/1538460-34302350.pdf?src-supplier=Jameco, ComponentLink4Description=https://datasheet.ciiva.com/934/ds30301-934599.pdf?src-supplier=Digi-Key, ComponentLink4URL=https://datasheet.ciiva.com/934/ds30301-934599.pdf?src-supplier=Digi-Key, ComponentLink5Description=https://datasheet.ciiva.com/15219/getdatasheetpartid-141065-15219671.pdf?src-supplier=Verical, ComponentLink5URL=https://datasheet.ciiva.com/15219/getdatasheetpartid-141065-15219671.pdf?src-supplier=Verical, ComponentLink6Description=https://datasheet.ciiva.com/934/ds30301-934600.pdf?src-supplier=Digi-Key, ComponentLink6URL=https://datasheet.ciiva.com/934/ds30301-934600.pdf?src-supplier=Digi-Key, ComponentLink7Description=https://datasheet.ciiva.com/934/ds30301-934601.pdf?src-supplier=Digi-Key, ComponentLink7URL=https://datasheet.ciiva.com/934/ds30301-934601.pdf?src-supplier=Digi-Key, ComponentLink8Description=https://datasheet.ciiva.com/22712/1915455-22712378.pdf?src-supplier=Element14, ComponentLink8URL=https://datasheet.ciiva.com/22712/1915455-22712378.pdf?src-supplier=Element14, ComponentLink9Description=https://datasheet.ciiva.com/3304/ds30301-3304395.pdf?src-supplier=Avnet, ComponentLink9URL=https://datasheet.ciiva.com/3304/ds30301-3304395.pdf?src-supplier=Avnet, ComponentLink10Description=https://datasheet.ciiva.com/16287/ds30301-16287372.pdf?src-supplier=Future+Electronics, ComponentLink10URL=https://datasheet.ciiva.com/16287/ds30301-16287372.pdf?src-supplier=Future+Electronics, ComponentLink11Description=https://datasheet.ciiva.com/1188/ds30301-1188477.pdf?src-supplier=Element14, ComponentLink11URL=https://datasheet.ciiva.com/1188/ds30301-1188477.pdf?src-supplier=Element14, ComponentLink12Description=https://datasheet.ciiva.com/17323/ds30301-17323949.pdf?src-supplier=Avnet+Europe, ComponentLink12URL=https://datasheet.ciiva.com/17323/ds30301-17323949.pdf?src-supplier=Avnet+Europe, Contact Plating=Tin,Matte, Current Rating=115mA, Drain to Source Voltage (Vdss)=60V, Element Configuration=Single, FET Technology="METAL-OXIDE SEMICONDUCTOR", Height=0.75mm, JESD-30 Code=R-PDSO-G3, Lead Free="Lead Free", Length=1.6mm, Manufacturer Part Number=2N7002T-7-F, Min Breakdown Voltage=60V, Moisture Sensitivity Level=1, Mount="Surface Mount", Nominal Vgs=2V, Number of Channels=1, Number of Elements=1, Number of Pins=3, Number of Terminals/Pins=3, On-State Resistance=7.5R, Packaging="Tape and Reel", Polarity=N-CHANNEL, Power Dissipation=150mW, Pricing 1="1=0.44000, 10=0.32400, 100=0.18340, 500=0.12144, 1000=0.09310 (USD)", Radiation Hardening=No, Rds On Max=7.5R, REACH SVHC="No SVHC", RoHS=Yes, RoHS Compliant=Yes, Series=-, Stock 1=56526, Supplier 1=Digi-Key, Surface Mount=Yes, Terminal Finish=Tin, Terminal Form="Gull Wing", Terminal Position=DUAL, Transistor Application=SWITCHING, Transistor Element Material=SILICON, Turn-Off Delay Time=11ns, Turn-On Delay Time=7ns, Voltage Rating (DC)=60V, Weight=7.1E-05oz, Width=0.8mm
Q2 Q3: "Trans GP BJT NPN 40V 0.6A 3-Pin SOT-23 T/R", Case/Package=SOT-23, Collector Base Voltage (VCBO)=75V, Collector Emitter Breakdown Voltage=40V, Collector Emitter Saturation Voltage=1V, Continuous Collector Current=600mA, Current=1A, Emitter Base Voltage (VEBO)=6V, Frequency=300MHz, Manufacturer=Diodes, Max Operating Temperature=150°C, Max Power Dissipation=300mW, Min Operating Temperature=-55°C, Package Quantity=3000, Power Dissipation=350mW, Supplier Part Number 1=MMBT2222A-FDICT-ND, Category=BJTs, Collector Emitter Voltage (VCEO)=40V, Collector-emitter Voltage-Max=1V, ComponentLink1Description=https://datasheet.ciiva.com/15139/getdatasheetpartid-82692-15139078.pdf?src-supplier=Verical, ComponentLink1URL=https://datasheet.ciiva.com/15139/getdatasheetpartid-82692-15139078.pdf?src-supplier=Verical, ComponentLink2Description=https://datasheet.ciiva.com/11198/ds30041-11198965.pdf?src-supplier=Avnet, ComponentLink2URL=https://datasheet.ciiva.com/11198/ds30041-11198965.pdf?src-supplier=Avnet, ComponentLink3Description=https://datasheet.ciiva.com/16199/ds30041-16199045.pdf?src-supplier=Future+Electronics, ComponentLink3URL=https://datasheet.ciiva.com/16199/ds30041-16199045.pdf?src-supplier=Future+Electronics, ComponentLink4Description=https://datasheet.ciiva.com/972/ds30041-972550.pdf?src-supplier=Digi-Key, ComponentLink4URL=https://datasheet.ciiva.com/972/ds30041-972550.pdf?src-supplier=Digi-Key, ComponentLink5Description=https://datasheet.ciiva.com/972/ds30041-972551.pdf?src-supplier=Digi-Key, ComponentLink5URL=https://datasheet.ciiva.com/972/ds30041-972551.pdf?src-supplier=Digi-Key, ComponentLink6Description=https://datasheet.ciiva.com/972/ds30041-972552.pdf?src-supplier=Digi-Key, ComponentLink6URL=https://datasheet.ciiva.com/972/ds30041-972552.pdf?src-supplier=Digi-Key, ComponentLink7Description=https://datasheet.ciiva.com/11201/ds30041-11201864.pdf?src-supplier=Avnet, ComponentLink7URL=https://datasheet.ciiva.com/11201/ds30041-11201864.pdf?src-supplier=Avnet, ComponentLink8Description=https://datasheet.ciiva.com/16615/ds30041-16615211.pdf?src-supplier=Avnet+Europe, ComponentLink8URL=https://datasheet.ciiva.com/16615/ds30041-16615211.pdf?src-supplier=Avnet+Europe, ComponentLink9Description=https://datasheet.ciiva.com/8029/ds30041-8029709.pdf?src-supplier=Element14, ComponentLink9URL=https://datasheet.ciiva.com/8029/ds30041-8029709.pdf?src-supplier=Element14, Contact Plating=Tin,Matte, Current Rating=600mA, Element Configuration=Single, Gain Bandwidth Product=300MHz, Height=1mm, hFE Min=100, Lead Free="Lead Free", Length=3.05mm, Manufacturer Part Number=MMBT2222A-7-F, Max Breakdown Voltage=40V, Max Collector Current=600mA, Max Frequency=300MHz, Mount="Surface Mount", Number of Elements=1, Number of Pins=3, Packaging="Tape and Reel", Polarity=NPN, Pricing 1="1=0.14000, 10=0.13200, 100=0.07200, 500=0.04430, 1000=0.03021 (USD)", Radiation Hardening=No, REACH SVHC="No SVHC", RoHS=Yes, RoHS Compliant=Yes, Series=-, Supplier 1=Digi-Key, Termination=SMD/SMT, Transition Frequency=300MHz, Voltage=40V, Voltage Rating (DC)=40V, Weight=0.000282oz, Width=1.4mm
Q4: "MOSFET N/P-CH 60V/50V SC70-6", Case/Package=SOT-363, Continuous Drain Current (ID)=115mA, Drain to Source Resistance=4.4R, Drain to Source Voltage (Vdss)=-50V, Drain-source On Resistance-Max=10R, Dual Supply Voltage=60V, Gate to Source Voltage (Vgs)=20V, Input Capacitance=50pF, Manufacturer=Diodes, Max Operating Temperature=150°C, Max Power Dissipation=200mW, Min Operating Temperature=-55°C, Package Quantity=3000, Supplier Part Number 1=BSS8402DW-FDICT-ND, Threshold Voltage=2.5V, Category=MOSFETs, ComponentLink1Description=https://datasheet.ciiva.com/1252/ds30380-1252496.pdf?src-supplier=Newark, ComponentLink1URL=https://datasheet.ciiva.com/1252/ds30380-1252496.pdf?src-supplier=Newark, ComponentLink2Description=https://datasheet.ciiva.com/4442/ds30380-80943-4442992.pdf?src-supplier=Mouser, ComponentLink2URL=https://datasheet.ciiva.com/4442/ds30380-80943-4442992.pdf?src-supplier=Mouser, ComponentLink3Description=https://datasheet.ciiva.com/34302/1539454-34302372.pdf?src-supplier=Jameco, ComponentLink3URL=https://datasheet.ciiva.com/34302/1539454-34302372.pdf?src-supplier=Jameco, ComponentLink4Description=https://datasheet.ciiva.com/26789/bss8402dw-7-f-26789052.pdf?src-supplier=IIIC, ComponentLink4URL=https://datasheet.ciiva.com/26789/bss8402dw-7-f-26789052.pdf?src-supplier=IIIC, ComponentLink5Description=https://datasheet.ciiva.com/17323/ds30380-17323221.pdf?src-supplier=Avnet+Europe, ComponentLink5URL=https://datasheet.ciiva.com/17323/ds30380-17323221.pdf?src-supplier=Avnet+Europe, ComponentLink6Description=https://datasheet.ciiva.com/928/ds30380-928742.pdf?src-supplier=Digi-Key, ComponentLink6URL=https://datasheet.ciiva.com/928/ds30380-928742.pdf?src-supplier=Digi-Key, ComponentLink7Description=https://datasheet.ciiva.com/928/ds30380-928743.pdf?src-supplier=Digi-Key, ComponentLink7URL=https://datasheet.ciiva.com/928/ds30380-928743.pdf?src-supplier=Digi-Key, ComponentLink8Description=https://datasheet.ciiva.com/928/ds30380-928744.pdf?src-supplier=Digi-Key, ComponentLink8URL=https://datasheet.ciiva.com/928/ds30380-928744.pdf?src-supplier=Digi-Key, ComponentLink9Description=https://datasheet.ciiva.com/16419/ds30380-16419384.pdf?src-supplier=Future+Electronics, ComponentLink9URL=https://datasheet.ciiva.com/16419/ds30380-16419384.pdf?src-supplier=Future+Electronics, ComponentLink10Description=https://datasheet.ciiva.com/1190/ds30380-1190250.pdf?src-supplier=Element14, ComponentLink10URL=https://datasheet.ciiva.com/1190/ds30380-1190250.pdf?src-supplier=Element14, Contact Plating=Tin,Matte, Current Rating=115mA, Element Configuration=Dual, FET Type="N and P-Channel", Height=1mm, Lead Free="Lead Free", Length=2.2mm, Manufacturer Part Number=BSS8402DW-7-F, Mount="Surface Mount", Nominal Vgs=2.5V, Number of Channels=2, Number of Elements=2, Number of Pins=6, On-State Resistance=10R, Packaging="Tape and Reel", Polarity=N-CHANNEL,P-CHANNEL, Power Dissipation=200mW, Pricing 1="1=0.55000, 10=0.44500, 100=0.30310, 500=0.22730, 1000=0.17048 (USD)", Rds On Max=7.5R, REACH SVHC="No SVHC", RoHS=Yes, RoHS Compliant=Yes, Series=-, Stock 1=180980, Supplier 1=Digi-Key, Termination=SMD/SMT, Turn-Off Delay Time=18ns, Turn-On Delay Time=10ns, Weight=0.000212oz, Width=1.35mm
Q5: "MOSFET N-CH 50V 200MA SOT-23", Case/Package=SOT-23-3, Continuous Drain Current (ID)=200mA, Drain to Source Breakdown Voltage=50V, Drain to Source Resistance=3.5R, Gate to Source Voltage (Vgs)=20V, Input Capacitance=50pF, Manufacturer="ON Semiconductor", Max Operating Temperature=150°C, Max Power Dissipation=225mW, Min Operating Temperature=-55°C, Package Quantity=1, Supplier Part Number 1=BSS138LT1GOSDKR-ND, Threshold Voltage=1.5V, ComponentLink1Description=https://datasheet.ciiva.com/22641/1596366-22641636.pdf, ComponentLink1URL=https://datasheet.ciiva.com/22641/1596366-22641636.pdf, ComponentLink2Description=https://datasheet.ciiva.com/1190/1596366-1190137.pdf, ComponentLink2URL=https://datasheet.ciiva.com/1190/1596366-1190137.pdf, ComponentLink3Description=https://datasheet.ciiva.com/15198/getdatasheetpartid-110266-15198908.pdf, ComponentLink3URL=https://datasheet.ciiva.com/15198/getdatasheetpartid-110266-15198908.pdf, ComponentLink4Description=https://datasheet.ciiva.com/8115/bss138lt1-d-8115295.pdf, ComponentLink4URL=https://datasheet.ciiva.com/8115/bss138lt1-d-8115295.pdf, ComponentLink5Description=https://datasheet.ciiva.com/8115/bss138lt1-d-8115358.pdf, ComponentLink5URL=https://datasheet.ciiva.com/8115/bss138lt1-d-8115358.pdf, ComponentLink6Description=https://datasheet.ciiva.com/1190/1596366-1190136.pdf, ComponentLink6URL=https://datasheet.ciiva.com/1190/1596366-1190136.pdf, ComponentLink7Description=https://datasheet.ciiva.com/936/bss138lt1-d-936802.pdf, ComponentLink7URL=https://datasheet.ciiva.com/936/bss138lt1-d-936802.pdf, ComponentLink8Description=https://datasheet.ciiva.com/936/bss138lt1-d-936801.pdf, ComponentLink8URL=https://datasheet.ciiva.com/936/bss138lt1-d-936801.pdf, ComponentLink9Description=https://datasheet.ciiva.com/14553/70099493-14553829.pdf, ComponentLink9URL=https://datasheet.ciiva.com/14553/70099493-14553829.pdf, ComponentLink10Description=https://datasheet.ciiva.com/936/bss138lt1-d-936803.pdf, ComponentLink10URL=https://datasheet.ciiva.com/936/bss138lt1-d-936803.pdf, ComponentLink11Description=http://www.onsemi.com/pub/Collateral/BSS138LT1-D.PDF?src-supplier=Digi-Key, ComponentLink11URL=http://www.onsemi.com/pub/Collateral/BSS138LT1-D.PDF?src-supplier=Digi-Key, ComponentLink12Description=http://www.farnell.com/datasheets/1596366.pdf?src-supplier=Element14, ComponentLink12URL=http://www.farnell.com/datasheets/1596366.pdf?src-supplier=Element14, ComponentLink13Description=http://www.alliedelec.com/m/d/b3c6fd7d92596813fe75d33dcbaaae90.pdf?src-supplier=Allied+Electronics, ComponentLink13URL=http://www.alliedelec.com/m/d/b3c6fd7d92596813fe75d33dcbaaae90.pdf?src-supplier=Allied+Electronics, ComponentLink14Description=https://www.verical.com/server-webapp/html/getDatasheet?partID=110266&src-supplier=Verical, ComponentLink14URL=https://www.verical.com/server-webapp/html/getDatasheet?partID=110266&src-supplier=Verical, ComponentLink15Description=http://www.onsemi.com/pub_link/Collateral/BSS138LT1-D.PDF?src-supplier=Avnet, ComponentLink15URL=http://www.onsemi.com/pub_link/Collateral/BSS138LT1-D.PDF?src-supplier=Avnet, Contact Plating=Tin,Matte, Current Rating=200mA, Element Configuration=Single, Halogen Free="Halogen Free", Height=1.01mm, Lead Free="Lead Free", Length=3.04mm, Manufacturer Part Number=BSS138LT1G, Nominal Vgs=1.5V, Number of Elements=1, Number of Pins=3, On-State Resistance=3.5R, Packaging="Tape and Reel", Power Dissipation=225mW, Pricing 1="1=0.27, 10=0.222, 100=0.1177, 500=0.07746, 1000=0.05267 (USD)", Radiation Hardening=No, Rds On Max=3.5R, REACH SVHC="No SVHC", Stock 1=1283212, Supplier 1=Digi-Key, Turn-Off Delay Time=20ns, Turn-On Delay Time=20ns, Voltage Rating (DC)=50V, Width=1.4mm
R1: library part RT0603BRD0747RL, "RES SMD 47 OHM 0.1% 1/10W 0603", Case Code (Imperial)=0603, Case Code (Metric)=1608, Manufacturer=Yageo, Max Operating Temperature=125°C, Max Power Dissipation=100mW, Min Operating Temperature=-55°C, Package Quantity=5000, Resistor Type="Thin Film", Supplier Part Number 1=YAG1668CT-ND, Temperature Coefficient=25ppm/°C, Tolerance=0.1%, Voltage Rating=75V, Voltage Rating (DC)=50V, Case/Package=0603, Category="Chip SMD Resistors", ComponentLink1Description=https://datasheet.ciiva.com/2585/pyu-rt-1-to-0-05-rohs-l-4-2585966.pdf?src-supplier=Digi-Key, ComponentLink1URL=https://datasheet.ciiva.com/2585/pyu-rt-1-to-0-05-rohs-l-4-2585966.pdf?src-supplier=Digi-Key, ComponentLink2Description=https://datasheet.ciiva.com/46635/pyu-rt-1-to-0-05-rohs-l-5-46635308.pdf?src-supplier=Digi-Key, ComponentLink2URL=https://datasheet.ciiva.com/46635/pyu-rt-1-to-0-05-rohs-l-5-46635308.pdf?src-supplier=Digi-Key, Construction=Rectangular, Contact Plating=Tin,Lead, Depth=0.8mm, Features="Moisture Resistant", Height=0.022inch, Lead Free="Lead Free", Length=0.063inch, Manufacturer Part Number=RT0603BRD0747RL, Military Standard=Not, Number of Terminations=2, Packaging="Tape and Reel", Power Rating=100mW, Pricing 1="1=0.34000, 10=0.28800, 100=0.11260, 1000=0.04716, 2500=0.04322 (USD)", Resistance=47R, RoHS=Yes, RoHS Compliant=Yes, Series=RT, Stock 1=10926, Supplier 1=Digi-Key, Termination=SMD/SMT, Width=0.031inch
R2 R6 R8 R11 R15 R16: library part CRGH0603J10K, "Surface Mount Thick Film Resistor, CRG Series, 10 kohm, 200 mW, - 5%, 50 V, 0603 [1608 Metric] ;RoHS Compliant: Yes", Case Code (Imperial)=0603, Case Code (Metric)=1608, Manufacturer="TE Connectivity Holsworthy", Max Operating Temperature=125°C, Min Operating Temperature=-55°C, Number of Resistors=1, Power Rating=200mW, Resistance=10kR, Resistance Tolerance=5%, Resistor Type="Thick Film,Power resistor", Supplier Part Number 1=A126394TR-ND, Temperature Coefficient=100ppm/°C, Voltage Rating=50V, Case/Package=0603, Category="Chip SMD Resistors", ComponentLink1Description=https://datasheet.ciiva.com/22722/1755795-22722956.pdf?src-supplier=Element14, ComponentLink1URL=https://datasheet.ciiva.com/22722/1755795-22722956.pdf?src-supplier=Element14, Depth=0.8mm, ELV=Compliant, Height=0.45mm, Length=1.6mm, Manufacturer Part Number=CRGH0603J10K, Mount="Surface Mount", Number of Terminations=2, Packaging="Tape and Reel", Pricing 1="5000=0.00758 (USD)", REACH SVHC="No SVHC", RoHS=Yes, RoHS Compliant=Yes, Series=CRGH, Stock 1=5000, Supplier 1=Digi-Key, Technology="THICK FILM", Termination=Solder, Tolerance=5%, Voltage Rating (DC)=50V, Width=0.8mm
R7: library part TC33X-2-103E, "TRIMMER 10K OHM 0.1W J LEAD TOP", Color=Silver, Manufacturer=Bourns, Max Operating Temperature=100°C, Max Power Dissipation=100mW, Min Operating Temperature=-40°C, Package Quantity=2500, Resistance=10kR, Resistance Tolerance=25%, Resistor Type=Cermet, Supplier Part Number 1=TC33X-103EDKR-ND, Temperature Coefficient=250ppm/°C, Voltage Rating (DC)=50V, ComponentLink1Description=http://www.farnell.com/datasheets/2146212.pdf?src-supplier=Element14, ComponentLink1URL=http://www.farnell.com/datasheets/2146212.pdf?src-supplier=Element14, ComponentLink2Description=http://www.farnell.com/datasheets/1520225.pdf?src-supplier=Element14, ComponentLink2URL=http://www.farnell.com/datasheets/1520225.pdf?src-supplier=Element14, ComponentLink3Description=http://uk.rs-online.com/webdocs/0274/0900766b802749b3.pdf?src-supplier=RSComponents, ComponentLink3URL=http://uk.rs-online.com/webdocs/0274/0900766b802749b3.pdf?src-supplier=RSComponents, ComponentLink4Description=https://www.bourns.com/docs/Product-Datasheets/TC33.pdf?src-supplier=Digi-Key, ComponentLink4URL=https://www.bourns.com/docs/Product-Datasheets/TC33.pdf?src-supplier=Digi-Key, ComponentLink5Description=http://www.bourns.com/pdfs/tc33.pdf?src-supplier=Avnet, ComponentLink5URL=http://www.bourns.com/pdfs/tc33.pdf?src-supplier=Avnet, ComponentLink6Description=https://www.verical.com/server-webapp/html/getDatasheet?partID=183773&src-supplier=Verical, ComponentLink6URL=https://www.verical.com/server-webapp/html/getDatasheet?partID=183773&src-supplier=Verical, ComponentLink7Description=http://www.bourns.com/pdfs/tc33.pdf?src-supplier=Avnet+Europe, ComponentLink7URL=http://www.bourns.com/pdfs/tc33.pdf?src-supplier=Avnet+Europe, Contact Plating=Copper,Tin,Silver, Depth=3.8mm, Height=0.047inch, Lead Free="Lead Free", Length=3mm, Manufacturer Part Number=TC33X-2-103E, Military Standard=Not, Mount="Surface Mount", Number of Turns=1, Packaging="Tape and Reel", Power Rating=100mW, Pricing 1="1=0.26, 10=0.252, 25=0.2276, 50=0.217, 100=0.21, 250=0.196, 500=0.1785, 1000=0.161 (USD)", Radiation Hardening=No, REACH SVHC="No SVHC", RoHS Compliant=Yes, Series=TC33, Stock 1=79201, Supplier 1=Digi-Key, Taper=Linear, Termination="Foot Print", Tolerance=25%, Weight=29.4mg, Width=0.118inch
R9 R26: library part RC0603FR-074K7L, "RES SMD 4.7K OHM 1% 1/10W 0603", Case Code (Imperial)=0603, Case Code (Metric)=1608, Manufacturer=Yageo, Max Operating Temperature=155°C, Max Power Dissipation=100mW, Min Operating Temperature=-55°C, Resistance=4.7kR, Resistance Tolerance=1%, Resistor Type="Thick Film", Supplier Part Number 1=311-4.70KHRCT-ND, Temperature Coefficient=100ppm/°C, Voltage Rating=50V, Case/Package=0603, Category="Chip SMD Resistors", ComponentLink1Description=https://datasheet.ciiva.com/15189/getdatasheetpartid-422754-15189760.pdf?src-supplier=Verical, ComponentLink1URL=https://datasheet.ciiva.com/15189/getdatasheetpartid-422754-15189760.pdf?src-supplier=Verical, ComponentLink2Description=https://datasheet.ciiva.com/22747/443971-22747528.pdf?src-supplier=Element14, ComponentLink2URL=https://datasheet.ciiva.com/22747/443971-22747528.pdf?src-supplier=Element14, ComponentLink3Description=https://datasheet.ciiva.com/7660/38590-7660794.pdf?src-supplier=Element14, ComponentLink3URL=https://datasheet.ciiva.com/7660/38590-7660794.pdf?src-supplier=Element14, ComponentLink4Description=https://datasheet.ciiva.com/7746/1868787-7746365.pdf?src-supplier=Element14, ComponentLink4URL=https://datasheet.ciiva.com/7746/1868787-7746365.pdf?src-supplier=Element14, ComponentLink5Description=https://datasheet.ciiva.com/46440/1868787-46440909.pdf?src-supplier=Element14, ComponentLink5URL=https://datasheet.ciiva.com/46440/1868787-46440909.pdf?src-supplier=Element14, ComponentLink6Description=https://datasheet.ciiva.com/7746/1738695-7746366.pdf?src-supplier=Element14, ComponentLink6URL=https://datasheet.ciiva.com/7746/1738695-7746366.pdf?src-supplier=Element14, Construction=Rectangular, Depth=0.8mm, Features="Moisture Resistant", Height=0.45mm, Lead Free="Lead Free", Lead Pitch=0.3mm, Length=1.6mm, Manufacturer Part Number=RC0603FR-074K7L, Military Standard=Not, Number of Pins=2, Number of Terminations=2, Packaging="Tape and Reel", Power Rating=100mW, Pricing 1="1=0.10000, 10=0.02400, 100=0.00970, 1000=0.00436, 2500=0.00378 (USD)", REACH SVHC="No SVHC", RoHS=Yes, RoHS Compliant=Yes, Series=RC, Size Code=0603, Stock 1=1924316, Supplier 1=Digi-Key, Termination=SMD/SMT, Tolerance=1%, Voltage Rating (DC)=50V, Width=0.8mm
R10: library part RC0603FR-13470KL, "Thick Film Resistors - SMD 470K OHM 1%", Case Code (Imperial)=0603, Case Code (Metric)=1608, Manufacturer=Yageo, Max Operating Temperature=155°C, Min Operating Temperature=-55°C, Power Rating=100mW, Resistance=470kR, Resistor Type="Thick Film", Supplier Part Number 1=13-RC0603FR-13470KLCT-ND, Temperature Coefficient=100ppm/°C, Tolerance=1%, Voltage Rating=50V, Case/Package=0603, Category="Chip SMD Resistors", ComponentLink1Description=https://datasheet.ciiva.com/8885/pyu-rc0603-51-rohs-l-4-8885646.pdf?src-supplier=Avnet, ComponentLink1URL=https://datasheet.ciiva.com/8885/pyu-rc0603-51-rohs-l-4-8885646.pdf?src-supplier=Avnet, Construction=Rectangular, Contact Plating=Tin,Matte, Depth=0.8mm, Height=0.45mm, Length=1.6mm, Manufacturer Part Number=RC0603FR-13470KL, Military Standard=Not, Packaging="Tape and Reel", Pricing 1="1=0.10000, 10=0.02400, 100=0.00970, 1000=0.00436, 2500=0.00378, 5000=0.00312 (USD)", RoHS=Yes, RoHS Compliant=Yes, Series=RC, Stock 1=39775, Supplier 1=Digi-Key, Termination=SMD/SMT, Width=0.8mm